# Altium PCB DAP-PCB-REV-3.PcbDoc (part 4 of 5)
Units mm, origin at the board's own origin, x right, y up, seen from the top; angles counter-clockwise.
Board outline 54.75 x 54.75 mm, 6 copper layers (L1 (SIG/PWR), L2 (GND), L3 (SIG), L4 (PWR), L5 (GND), L6 (SIG/PWR)), stack 1.65 mm thick; 309 components, 179 nets, 957 pads, 421 vias.
Unrouted connection lines stored in the file: 36.
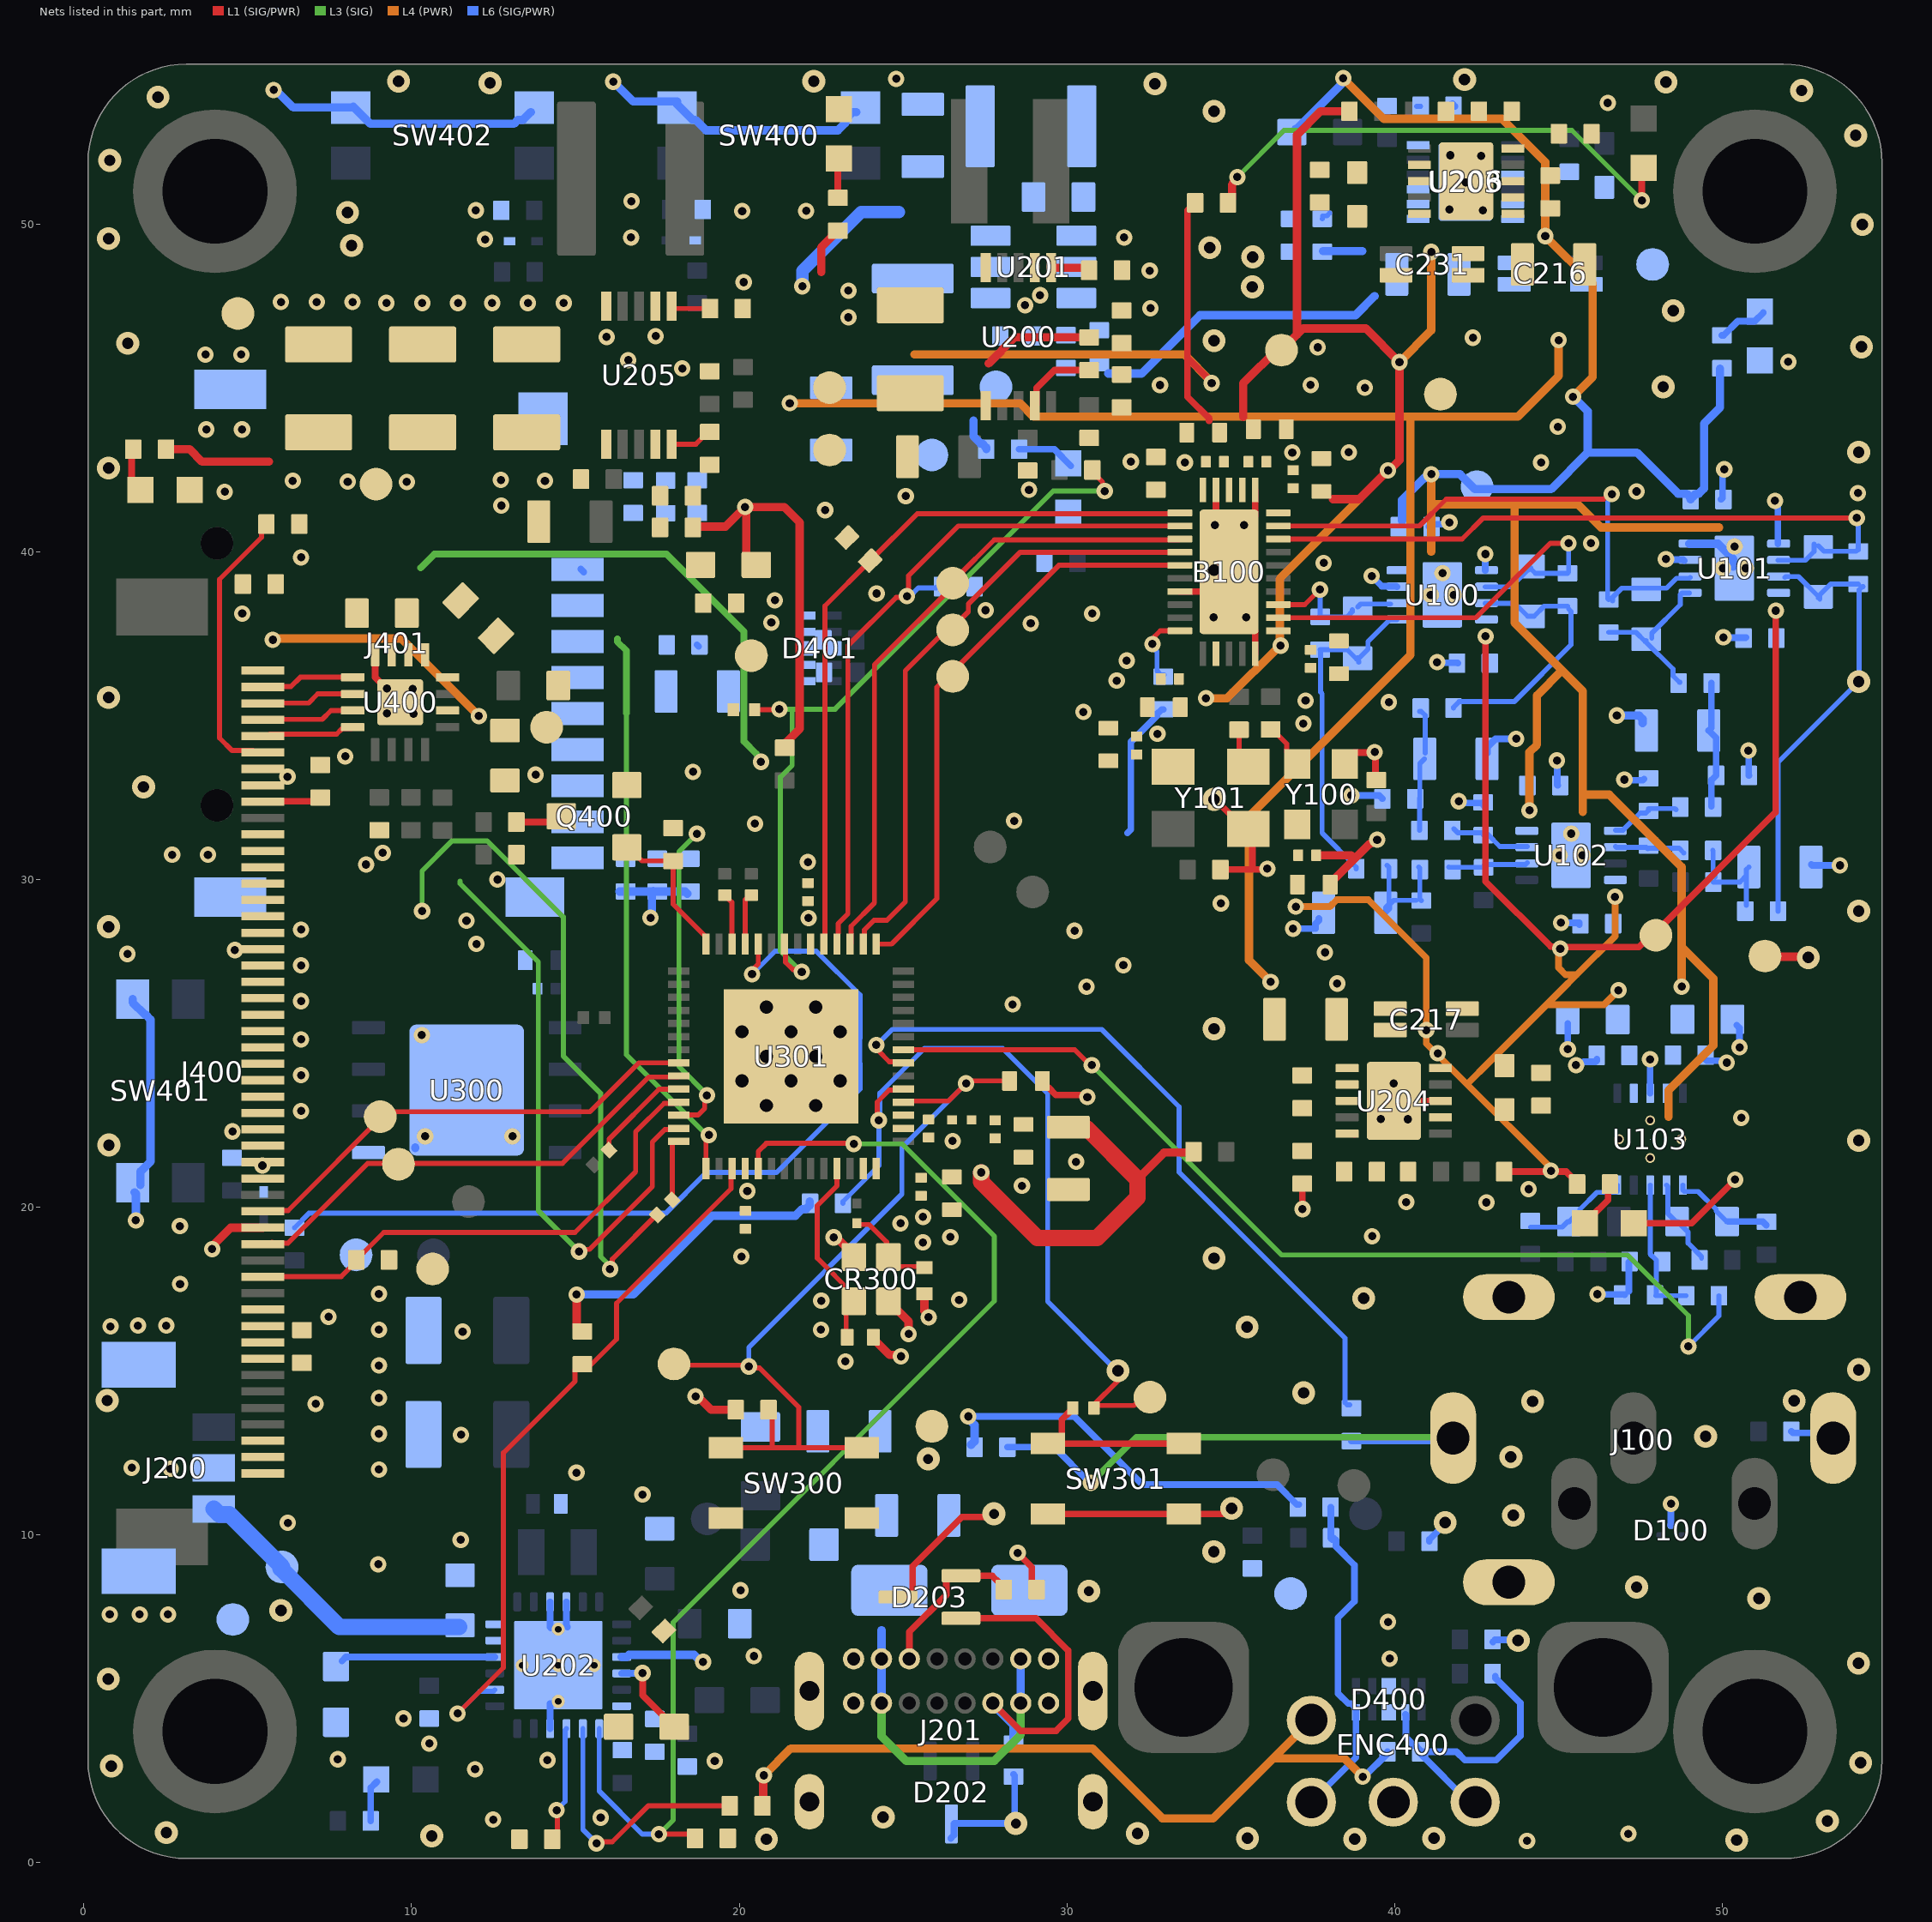
[diagram p6: the nets of this part, all layers, seen from the top]

## Via types
v1: diameter 0.5, hole 0.25, L1 (SIG/PWR) to L6 (SIG/PWR), tented both sides, 335 vias
v2: diameter 0.7, hole 0.35, L1 (SIG/PWR) to L6 (SIG/PWR), tented both sides, 69 vias
v3: diameter 0.7, hole 0.3, L1 (SIG/PWR) to L6 (SIG/PWR), tented both sides, 6 vias
v4: diameter 1.25, hole 0.75, L1 (SIG/PWR) to L6 (SIG/PWR), 6 vias
v5: diameter 0.4/0.4/0.4/0.4/0.4/0.4 (per signal layer), hole 0.2, L1 (SIG/PWR) to L6 (SIG/PWR), tented both sides, 5 vias

## Nets (pads, with @x,y where several pads share a name; then routed paths per layer and width w, separated by ;. In a path a pad name is that pad's centre, name@x,y a point inside that pad or via, vN(x,y) a via of type N, cw(c..) or ccw(c..) an arc to the next point about the centre after c; other vN are vias at no path point) (continued)
GND: (continued)
  other v1: 44.045,0.659 47.136,0.877 12.49,1.31 15.773,1.372 11.938,2.845 19.253,3.099 14.148,3.124 7.747,3.15 10.541,3.632 9.754,4.394 39.853,6.223 20.448,6.298 39.802,7.341 0.788,7.568 1.702,7.569 2.565,7.569 20.041,8.306 8.985,9.1 11.501,9.849 6.223,10.363 17.047,11.227 15.034,11.897 9.006,11.991 2.643,12.013 1.459,12.045 11.508,13.053 9.006,13.084 7.076,13.997 9.006,14.176 9.006,15.166 23.241,15.291 24.935,15.444 25.171,16.129 11.559,16.203 9.006,16.259 22.497,16.257 0.814,16.356 1.651,16.383 2.515,16.383 25.781,16.637 22.504,17.145 26.713,17.172 46.197,17.343 9.006,17.351 2.935,17.655 20.066,18.491 25.608,18.921 22.885,19.075 26.445,19.087 39.319,19.11 2.929,19.42 24.922,19.505 25.61,19.699 40.361,20.152 42.806,20.143 44.094,20.549 28.631,20.648 50.398,20.839 5.448,21.268 30.282,21.385 26.513,22.017 10.414,22.162 13.081,22.162 4.534,22.309 39.578,22.687 40.411,22.682 50.586,22.726 6.629,22.933 39.98,23.774 6.629,24.025 47.803,24.511 6.629,25.117 10.312,25.248 28.346,26.187 6.629,26.286 30.601,26.728 38.252,26.823 6.629,27.378 31.725,27.381 1.328,27.726 37.877,27.772 4.609,27.844 11.979,28.03 30.237,28.434 6.629,28.47 11.677,28.741 34.702,29.271 12.624,29.997 8.611,30.455 22.098,30.531 2.693,30.753 3.786,30.753 9.119,30.81 39.473,31.211 20.48,31.699 28.392,31.788 13.788,33.198 18.587,33.286 7.976,33.757 43.713,34.29 32.766,34.442 37.217,34.757 9.25,35.067 10.058,35.052 30.507,35.111 39.827,35.408 9.25,35.829 10.033,35.814 31.521,36.068 31.827,36.677 28.898,37.814 20.981,37.84 34.478,37.997 35.469,37.997 4.833,38.113 30.771,38.113 27.52,38.215 21.089,38.518 24.195,38.725 37.84,39.656 6.629,39.827 45.999,40.259 35.408,40.818 22.624,41.271 12.74,41.409 25.083,41.698 54.146,41.79 4.299,41.83 47.39,41.841 28.846,41.888 14.072,42.164 12.725,42.189 50.064,42.514 33.604,42.723 44.475,42.723 31.955,42.75 36.881,43.028 38.607,43.033 3.735,43.732 4.827,43.732 44.983,43.815 39.097,45.002 32.844,45.086 37.442,45.087 18.263,45.593 52.019,45.796 16.612,45.847 3.709,46.018 4.802,46.018 37.655,46.237 15.952,46.553 42.393,46.533 17.451,46.578 23.334,47.153 32.554,47.433 28.727,47.523 9.233,47.592 10.325,47.592 11.418,47.592 12.459,47.592 13.551,47.592 14.643,47.592 6.013,47.619 7.105,47.619 8.197,47.619 29.185,47.828 23.334,47.966 20.138,48.226 32.529,48.576 12.243,49.53 16.7,49.589 31.748,49.592 20.091,50.394 22.045,50.399 11.963,50.419 42.696,50.424 41.68,50.449 16.713,50.698 42.173,51.267 42.645,52.075 41.705,52.1 46.507,53.696 24.79,54.432
  other v2: 50.445,0.685 20.829,0.71 38.789,0.713 35.512,0.738 41.202,0.738 10.618,0.812 32.156,0.889 2.516,0.913 53.214,1.269 24.394,1.384 0.839,2.945 54.23,3.047 0.746,5.6 54.162,6.082 6.012,7.694 51.122,8.06 47.389,8.405 34.486,9.487 41.546,10.371 43.629,10.6 35.026,10.807 43.552,12.378 49.497,13.003 44.214,14.069 52.2,14.086 0.711,14.097 37.228,14.333 54.168,15.037 35.501,16.34 39.058,17.219 34.493,18.442 0.762,21.895 54.168,22.037 34.493,25.442 0.752,28.554 54.168,29.037 1.82,32.825 0.752,35.554 34.493,39.442 0.752,42.554 54.168,43.037 48.199,45.032 54.255,46.252 1.338,46.363 34.493,46.442 48.505,47.353 35.662,48.082 35.675,48.996 34.361,49.277 8.168,49.343 0.753,49.554 54.28,49.987 8.043,50.351 0.788,51.942 54.078,52.704 34.493,53.442 2.262,53.872 52.427,54.075 32.691,54.279 12.396,54.304 48.286,54.329 9.602,54.355 22.277,54.355 42.139,54.407
  other v3: 28.443,1.193 30.673,8.282 27.775,10.64 25.769,12.317
  other v5: 14.478,4.92 13.378,6.02 14.478,6.02 15.578,6.02 14.478,7.12
GPIO1_DAC: B100.17 R112.2 U301.18 | length 22.2
  L1 (SIG/PWR) w0.152: U301.18@22.984,28.028 23.018,28.061 23.018,28.363 23.02,28.366 23.02,28.653 23.317,28.95 23.317,37.135 24.787,38.604 25.081,38.604 25.171,38.694 25.171,39.268 26.689,40.786 B100.17@33.293,40.786
  L6 (SIG/PWR) w0.152: v1(25.12,38.643) 25.214,38.643 25.471,38.9 26.014,38.9 26.103,38.989 R112.2@26.137,38.989
GPIO2_DAC: B100.16 R113.2 U301.19 | length 22.1
  L1 (SIG/PWR) w0.152: U301.19@22.584,28.028 22.618,28.061 22.618,28.363 22.62,28.366 22.62,38.346 R113.2@24.001,39.728 25.435,41.162 33.212,41.162 B100.16@33.249,41.199
ILIM_BQ: R217.2 U202.22 | length 2.7
  L1 (SIG/PWR) w0.203: v1@17.056,5.781 17.056,5.105 17.672,4.489 17.672,4.439 17.97,4.14 R217.2@18.02,4.14
  L6 (SIG/PWR) w0.203: U202.22@16.413,5.77 16.418,5.775 17.042,5.775 v1(17.047,5.781)
ILIM_DAC_LDO+: R246.2 U206.5 | length 0.3
  L1 (SIG/PWR) w0.203: U206.5@43.612,52.332 U206.5@43.614,52.308 ; R246.2@43.612,53.243 R246.2@43.612,53.492
ILIM_LDO+: R229.2 U204.5 | length 0.3
  L1 (SIG/PWR) w0.203: R229.2@38.329,20.948 R229.2@38.329,21.031 ; U204.5@38.555,22.241 38.765,22.241 U204.5@38.788,22.217
ILIM_LDO-: R230.2 U203.6 | length 0.1
  L6 (SIG/PWR) w0.152: R230.2@40.673,53.594 R230.2@40.8,53.594
IM0: J400.6 R402.2 | length 8.3
  L1 (SIG/PWR) w0.152: J400.6@5.207,33.883 5.158,33.932 4.524,33.932 4.14,34.316 4.14,39.16 5.422,40.441 5.422,40.804 R402.2@5.436,40.818
IM3: J400.9 R403.2 | length 1.9
  L1 (SIG/PWR) w0.203: J400.9@5.207,32.383 R403.2@7.148,32.383
INT_BQ: R210.1 U202.8 U301.45 | length 21.6
  L1 (SIG/PWR) w0.152: v1(11.405,4.547) 12.802,5.944 12.802,12.497 14.991,14.686 14.991,15.031 15.165,15.205 R210.1@15.215,15.205 ; R210.1@15.38,15.09 16.257,15.968 16.257,17.07 19.75,20.563 19.75,21.144 U301.45@19.784,21.178
  L6 (SIG/PWR) w0.152: v1(11.405,4.547) 12.084,5.226 12.499,5.226 U202.8@12.543,5.27
ISET_BQ: R218.2 U202.10 | length 4.7
  L6 (SIG/PWR) w0.203: R218.2@7.874,6.147 7.874,6.149 7.995,6.27 U202.10@12.543,6.27
IV_L: C107.1 R103.2 R116.1 U101.7 | length 13.7
  L6 (SIG/PWR) w0.152: R116.1@51.706,29.032 51.706,33.575 v2(54.168,36.037) ; U101.7@51.918,39.218 51.941,39.241 52.331,39.241 52.937,38.636 C107.1@52.937,38.586 ; C107.1@52.984,38.557 52.984,38.683 53.314,39.013 R103.2@54.156,39.013 ; v2@54.178,36.093 54.178,38.839 54.278,38.938 R103.2@54.305,38.938
IV_LB: C101.1 R101.2 R123.1 U101.1 | length 4.9
  L6 (SIG/PWR) w0.152: R101.2@46.536,37.54 47.373,37.54 C101.1@47.65,37.262 ; C101.1@47.679,37.29 47.679,37.24 48.5,36.419 48.5,36.216 48.699,36.017 R123.1@48.717,36.017 ; C101.1@47.854,37.363 47.854,37.515 48.727,38.388 48.727,38.692 48.776,38.741 U101.1@49,38.741
IV_R: C100.1 R100.2 R121.1 U100.1 | length 10.2
  L6 (SIG/PWR) w0.152: R100.2@37.735,37.012 38.554,37.012 C100.1@38.841,36.725 ; R100.2@37.744,36.932 37.744,35.714 37.791,35.667 37.791,31.42 38.833,30.378 R121.1@38.833,30.328 ; C100.1@38.878,36.762 38.878,36.712 39.189,37.023 39.189,37.258 39.798,37.867 39.798,37.878 39.847,37.927 U100.1@40.072,37.927 ; C100.1@38.913,36.627 C100.1@38.913,36.653
IV_RB: C106.1 R102.2 R131.1 U100.7 | length 8.3
  L6 (SIG/PWR) w0.152: R131.1@41.8,35.23 41.8,35.25 41.974,35.424 43.653,35.424 45.39,37.16 45.39,38.176 R102.2@45.314,38.252 ; U100.7@42.772,38.427 43.667,38.427 44.063,38.03 44.259,38.03 44.57,38.341 R102.2@45.279,38.341
JACK_DET: J100.4 R118.1 R119.2 | length 17.9
  L3 (SIG) w0.203: v1(30.727,11.579) 32.128,12.979 J100.4@41.758,12.979
  L6 (SIG/PWR) w0.203: R118.1@28.186,12.675 29.616,12.675 v1@30.683,11.608 ; R119.2@38.684,12.86 41.885,12.86 J100.4@41.885,12.725
LDO_BQ: C214.2 R214.2 U202.24
LED1: J400.2 U400.13 | length 3.1
  L1 (SIG/PWR) w0.152: J400.2@5.207,35.883 6.317,35.883 6.604,36.17 U400.13@8.23,36.17
LED2: J400.3 U400.14 | length 3.1
  L1 (SIG/PWR) w0.152: J400.3@5.207,35.383 6.859,35.383 7.137,35.662 U400.14@8.179,35.662
LED3: J400.4 U400.15 | length 3.1
  L1 (SIG/PWR) w0.152: J400.4@5.207,34.883 7.273,34.883 7.544,35.154 U400.15@8.204,35.154
LED4: J400.5 U400.16 | length 2.7
  L1 (SIG/PWR) w0.152: J400.5@5.639,34.392 5.679,34.432 7.711,34.432 7.876,34.597 8.155,34.597 U400.16@8.204,34.646
LEFT_EAR: C138.1 R127.1 U103.7 | length 2.7
  L6 (SIG/PWR) w0.152: U103.7@48.304,20.673 48.348,20.629 48.348,19.799 C138.1@48.589,19.558 ; C138.1@48.639,19.558 48.963,19.234 48.963,18.899 49.372,18.49 R127.1@49.372,18.44
MOSI_LCD: J400.34 TP403.1 U301.36 | length 14.6
  L1 (SIG/PWR) w0.152: J400.34@5.461,19.873 5.484,19.896 6.231,19.896 9.246,22.911 15.443,22.911 16.935,24.403 U301.36@18.159,24.403
NetC118_2: C118.2 R122.2 U102.2 | length 2.4
  L6 (SIG/PWR) w0.152: R122.2@41.656,30.378 41.663,30.372 C118.2@42.729,30.372 ; C118.2@42.723,30.404 42.775,30.456 44.001,30.456 U102.2@44.05,30.505
NetC123_2: C123.2 R120.2 U102.6 | length 2.1
  L6 (SIG/PWR) w0.152: U102.6@46.75,31.005 46.775,30.981 47.683,30.981 C123.2@47.727,30.937 ; C123.2@47.758,30.956 R120.2@48.673,30.956 ; R120.2@48.684,30.956 R120.2@48.83,30.81
NetC124_2: C124.2 R117.1 U103.10 | length 3.3
  L6 (SIG/PWR) w0.152: R117.1@44.157,19.39 45.119,19.39 45.287,19.558 45.337,19.558 45.661,19.882 45.661,19.932 46.178,20.449 46.76,20.449 46.804,20.493 U103.10@46.804,20.673
NetC127_2: C127.2 R115.1 R116.2 R120.1 | length 3.3
  L6 (SIG/PWR) w0.152: R120.1@49.714,30.886 49.723,30.878 49.723,30.135 R115.1@49.784,30.074 ; R115.1@49.731,29.921 50.541,29.921 50.741,30.121 R116.2@50.741,29.21 ; C127.2@50.815,30.378 C127.2@50.741,30.305 ; C127.2@50.741,30.305 50.741,30.147 C127.2@50.741,30.305
NetC130_2: C130.2 R114.1 R121.2 R122.1 | length 3.9
  L6 (SIG/PWR) w0.152: R121.2@39.776,30.429 39.833,30.372 39.833,29.221 39.975,29.362 R114.1@40.665,29.362 ; R122.1@40.742,30.378 40.775,30.345 40.775,29.397 R114.1@40.818,29.354 ; C130.2@39.726,28.978 39.726,29.139 39.859,29.272 39.859,29.111 C130.2@39.726,28.978
NetC131_2: C131.2 R123.2 R124.1 R126.2 | length 3.9
  L6 (SIG/PWR) w0.203: R123.2@49.674,35.992 49.674,34.627 C131.2@49.591,34.544 49.817,34.318 R126.2@49.817,33.172 49.676,33.031 R124.1@49.676,32.233
NetC132_1: C132.1 R124.2 U102.5 | length 2.1
  L6 (SIG/PWR) w0.152: U102.5@46.75,31.505 46.975,31.505 47.496,32.027 47.673,32.027 C132.1@47.752,32.106 ; C132.1@47.753,32.163 48.558,32.163 R124.2@48.59,32.131
NetC133_2: C133.2 R108.2 R128.2 U103.8 | length 4.4
  L6 (SIG/PWR) w0.152: U103.8@47.804,20.673 47.804,18.569 47.995,18.378 47.995,17.312 47.981,17.297 R128.2@48.903,17.297
NetC136_2: C136.2 R131.2 R132.1 R133.2 | length 3.6
  L6 (SIG/PWR) w0.152: R132.1@40.761,31.496 40.768,31.503 R133.2@40.768,32.486 ; R131.2@40.767,35.128 40.812,35.128 40.935,35.006 C136.2@40.935,33.858 ; R133.2@40.775,32.461 40.775,33.536 C136.2@40.919,33.68
NetC137_1: C137.1 R132.2 U102.3 | length 2.4
  L6 (SIG/PWR) w0.152: R132.2@41.808,31.547 41.929,31.427 C137.1@42.708,31.427 ; C137.1@42.708,31.369 42.854,31.369 43.217,31.005 U102.3@44.05,31.005
NetC138_2: C138.2 R134.1 U103.6 | length 3.1
  L6 (SIG/PWR) w0.152: U103.6@48.804,20.673 48.804,20.523 48.848,20.479 49.269,20.479 49.815,19.932 49.815,19.882 50.139,19.558 C138.2@50.189,19.558
  L6 (SIG/PWR) w0.203: C138.2@50.189,19.558 R134.1@51.21,19.558 ; R134.1@51.236,19.558 R134.1@51.345,19.448
NetC201_1: C201.1 L202.1 U201.5
NetC201_2: C201.2 L201.2 U201.1
NetC205_1: C205.1 R201.1 R204.2 U201.3
NetC212_1: C212.1 R213.1
NetC216_1: C216.1 C222.1 R232.1
NetC217_1: C217.1 C223.2 R233.1
NetC219_2: C219.2 D201.C FB200.1 J201.A4 J201.A9 J201.B4 J201.B9 | length 10.4
  L3 (SIG) w0.254: J201.B9@24.342,4.864 24.342,3.852 25.095,3.099 27.788,3.099 28.592,3.903 J201.B4@28.592,4.864
  L6 (SIG/PWR) w0.254: J201.B9@24.342,4.864 J201.A4@24.342,6.113 ; J201.A4@24.342,6.214 24.342,7.09 ; J201.B4@28.592,4.864 28.592,6.138 J201.A9@28.702,6.248
NetC221_2: C221.2 R227.1
NetC223_1: C223.1 R233.2 U204.7
NetC226_2: C226.2 R238.2
NetC231_1: C231.1 C233.2 R248.1
NetC233_1: C233.1 R248.2 U206.7
NetC302_2: C302.2 L300.1 U301.2 U301.3
NetC410_1: C410.1 U400.8
NetC410_2: C410.2 U400.9
NetC411_1: C411.1 U400.11
NetC411_2: C411.2 U400.10
NetD200_A: D200.A R206.1 | length 1.3
  L6 (SIG/PWR) w0.203: R206.1@8.755,1.27 8.755,2.278 D200.A@8.941,2.464
NetD203_1: D203.1 J201.B5 R234.2 | length 10.2
  L1 (SIG/PWR) w0.203: D203.1@26.766,7.453 29.058,7.453 30.046,6.465 30.046,4.392 29.667,4.013 28.588,4.013 J201.B5@27.699,4.902
  L6 (SIG/PWR) w0.254: J201.B5@27.813,4.928 27.813,4.752 28.372,4.194 R234.2@28.372,3.559
NetD203_2: D203.2 J201.A5 R235.2 | length 4.8
  L1 (SIG/PWR) w0.203: J201.A5@25.192,6.214 25.192,7.039 26.323,8.17 26.323,8.654 26.406,8.738 D203.2@26.594,8.738 ; D203.2@26.766,8.753 27.719,8.753 27.942,8.53 27.962,8.53 28.14,8.351 R235.2@28.14,8.331
NetD204_A: D204.A R242.1 | length 15.7
  L1 (SIG/PWR) w0.203: v1(47.549,50.724) 47.549,51.662 D204.A@47.6,51.713
  L1 (SIG/PWR) w0.254: R242.1@34.917,50.648 35.04,50.771 35.04,51.204 35.204,51.368 v1(35.204,51.435)
  L3 (SIG) w0.152: v1(35.204,51.435) 36.627,52.857 45.415,52.857 v1(47.549,50.724)
NetD205_C: D205.C R249.1 | length 1.8
  L6 (SIG/PWR) w0.203: R249.1@28.542,43.129 29.616,43.129 D205.C@30.124,42.621
NetD206_A: D206.A R250.1 | length 1.3
  L1 (SIG/PWR) w0.203: R250.1@23.012,50.8 23.012,51.892 D206.A@23.139,52.019
NetD207_A: D207.A R251.1 | length 1.3
  L1 (SIG/PWR) w0.203: D207.A@45.986,19.685 46.516,20.215 46.516,20.642 R251.1@46.576,20.701
NetD208_C: D208.C R252.1 | length 1.6
  L6 (SIG/PWR) w0.203: R252.1@49.994,46.601 50.044,46.601 50.478,47.035 50.998,47.035 D208.C@51.257,47.295
NetD209_A: D209.A R253.1 | length 1.2
  L1 (SIG/PWR) w0.203: R253.1@1.524,42.977 1.501,42.977 1.455,42.931 1.455,42.157 D209.A@1.727,41.885
NetD401_1: D401.1 J401.2 R416.1 | length 15.2
  L3 (SIG) w0.203: 10.278,39.508 10.698,39.929 17.78,39.929 20.142,37.567 20.142,34.214 20.527,33.829 20.527,33.809 v1@20.681,33.655
  other v1: 20.666,33.59
NetJ401_1: J401.1 R417.1 | length 0.1
  L6 (SIG/PWR) w0.203: J401.1@15.164,39.472 J401.1@15.257,39.378
NetJ401_8: J401.8 R418.1
NetQ400_1: Q400.1 R425.2 U301.28 | length 4.5
  L1 (SIG/PWR) w0.152: Q400.1@16.57,30.978 16.62,30.978 16.944,30.654 17.033,30.564 R425.2@17.983,30.564 17.983,29.243 18.984,28.243 U301.28@18.984,28.028
NetQ400_3: Q400.3 R423.1 | length 1.5
  L1 (SIG/PWR) w0.203: R423.1@13.175,31.75 14.3,31.75 Q400.3@14.554,32.004
NetR119_1: R119.1 U301.7 | length 22.8
  L1 (SIG/PWR) w0.152: v1(24.185,24.947) 24.251,24.88 24.251,24.766 24.581,24.436 24.975,24.436 U301.7@25.009,24.403
  L6 (SIG/PWR) w0.152: v1(24.185,24.947) 24.192,24.947 24.67,25.425 31.064,25.425 33.426,23.063 33.426,21.066 38.49,16.002 38.49,14.034 38.555,13.97 R119.1@38.633,13.97
NetR128_1: R128.1 U301.8 | length 30
  L1 (SIG/PWR) w0.152: U301.8@25.009,24.803 30.239,24.803 v1@30.683,24.359
  L3 (SIG) w0.152: v1(30.763,24.333) 36.555,18.542 47.117,18.542 48.971,16.688 48.971,15.909 49.005,15.875 v1@49.022,15.875
  L6 (SIG/PWR) w0.152: v1(48.971,15.748) 49.903,16.68 R128.1@49.903,17.297
NetR203_1: R203.1 R303.2 U301.22 | length 23.9
  L1 (SIG/PWR) w0.152: R303.2@20.396,35.179 21.158,35.179 v1@21.209,35.23 ; U301.22@21.384,28.028 21.414,27.998 21.414,27.474 21.641,27.246 21.844,27.246 v1(21.91,27.18) ; R203.1@30.777,42.494 30.777,42.444 31.09,42.131 31.09,41.918 v1(31.157,41.852)
  L3 (SIG) w0.152: v1(21.226,35.196) 21.615,35.196 ; v1(21.91,27.18) 21.893,27.18 21.26,27.813 21.26,33.122 21.615,33.477 21.615,35.196 ; v1(31.157,41.852) 29.583,41.852 22.927,35.196 21.615,35.196
NetR204_1: R204.1 U201.4
NetR207_2: R207.2 U200.1 | length 1.3
  L1 (SIG/PWR) w0.254: U200.1@29.524,48.665 30.759,48.665 R207.2@30.759,48.616
NetR219_1: R219.1 R226.2 U203.3 | length 0.3
  L6 (SIG/PWR) w0.152: R219.1@37.795,50.157 R219.1@37.795,50.165 ; R219.1@37.801,50.247 37.935,50.247 R219.1@38.019,50.331
NetR238_1: R238.1 U205.10 | length 1.3
  L1 (SIG/PWR) w0.152: U205.10@17.942,43.283 18.679,43.283 19.033,43.637 R238.1@19.126,43.637
NetR239_2: R239.2 U205.1 | length 1.2
  L1 (SIG/PWR) w0.152: U205.1@17.942,47.497 18.017,47.422 19.101,47.422 R239.2@19.126,47.447
NetR302_2: R302.2 SW301.1 SW301.2 | length 5.6
  L1 (SIG/PWR) w0.203: R302.2@30.175,13.843 30.175,13.838 30.107,13.77 30.102,13.77 29.844,13.512 29.844,13.008 29.621,12.784 SW301.1@29.421,12.784 33.536,12.784 SW301.2@33.553,12.802
NetR304_1: R304.1 U301.25 | length 1.6
  L1 (SIG/PWR) w0.152: U301.25@20.184,28.028 20.184,29.383 20.29,29.489 R304.1@20.396,29.489
NetR305_1: R305.1 U301.26 | length 1.3
  L1 (SIG/PWR) w0.152: R305.1@19.558,29.52 19.583,29.52 19.682,29.421 19.682,29.396 19.773,29.305 U301.26@19.773,28.346
NetR306_1: R306.1 U301.38 | length 2.9
  L1 (SIG/PWR) w0.152: R306.1@16.027,21.742 16.01,21.76 16.01,21.9 16.027,21.917 16.027,22.073 17.551,23.597 U301.38@17.983,23.597
NetR307_1: R307.1 U301.42 | length 2
  L1 (SIG/PWR) w0.152: R307.1@17.959,20.22 17.941,20.237 17.941,20.377 17.959,20.395 17.959,21.969 17.993,22.003 U301.42@18.159,22.003
NetR409_1: R409.1 U301.24 | length 27
  L1 (SIG/PWR) w0.152: v1@20.345,27.178 20.584,27.416 U301.24@20.584,28.028
  L6 (SIG/PWR) w0.152: R409.1@6.426,19.372 6.866,19.812 17.755,19.812 18.999,21.057 21.142,21.057 23.688,23.602 23.688,24.375 23.681,24.382 23.681,25.155 23.688,25.162 23.688,26.477 22.352,27.813 21.098,27.813 v1(20.392,27.106)

## Text inside footprints (layer, text, board x,y; h text height)
J201: Mechanical 13 "PCB EDGE" at 31.782,0.284 h0.81